# Altium PCB CM5_RP2040_MZM.PcbDoc (part 5 of 5)
Units mil, origin at the board's own origin, x right, y up, seen from the top; angles counter-clockwise.
Board outline 4724.41 x 3543.31 mil, 4 copper layers (Top Layer, GND L2, GND L3, Bottom Layer), stack 62.992 mil thick; 227 components, 122 nets, 905 pads, 3083 vias.
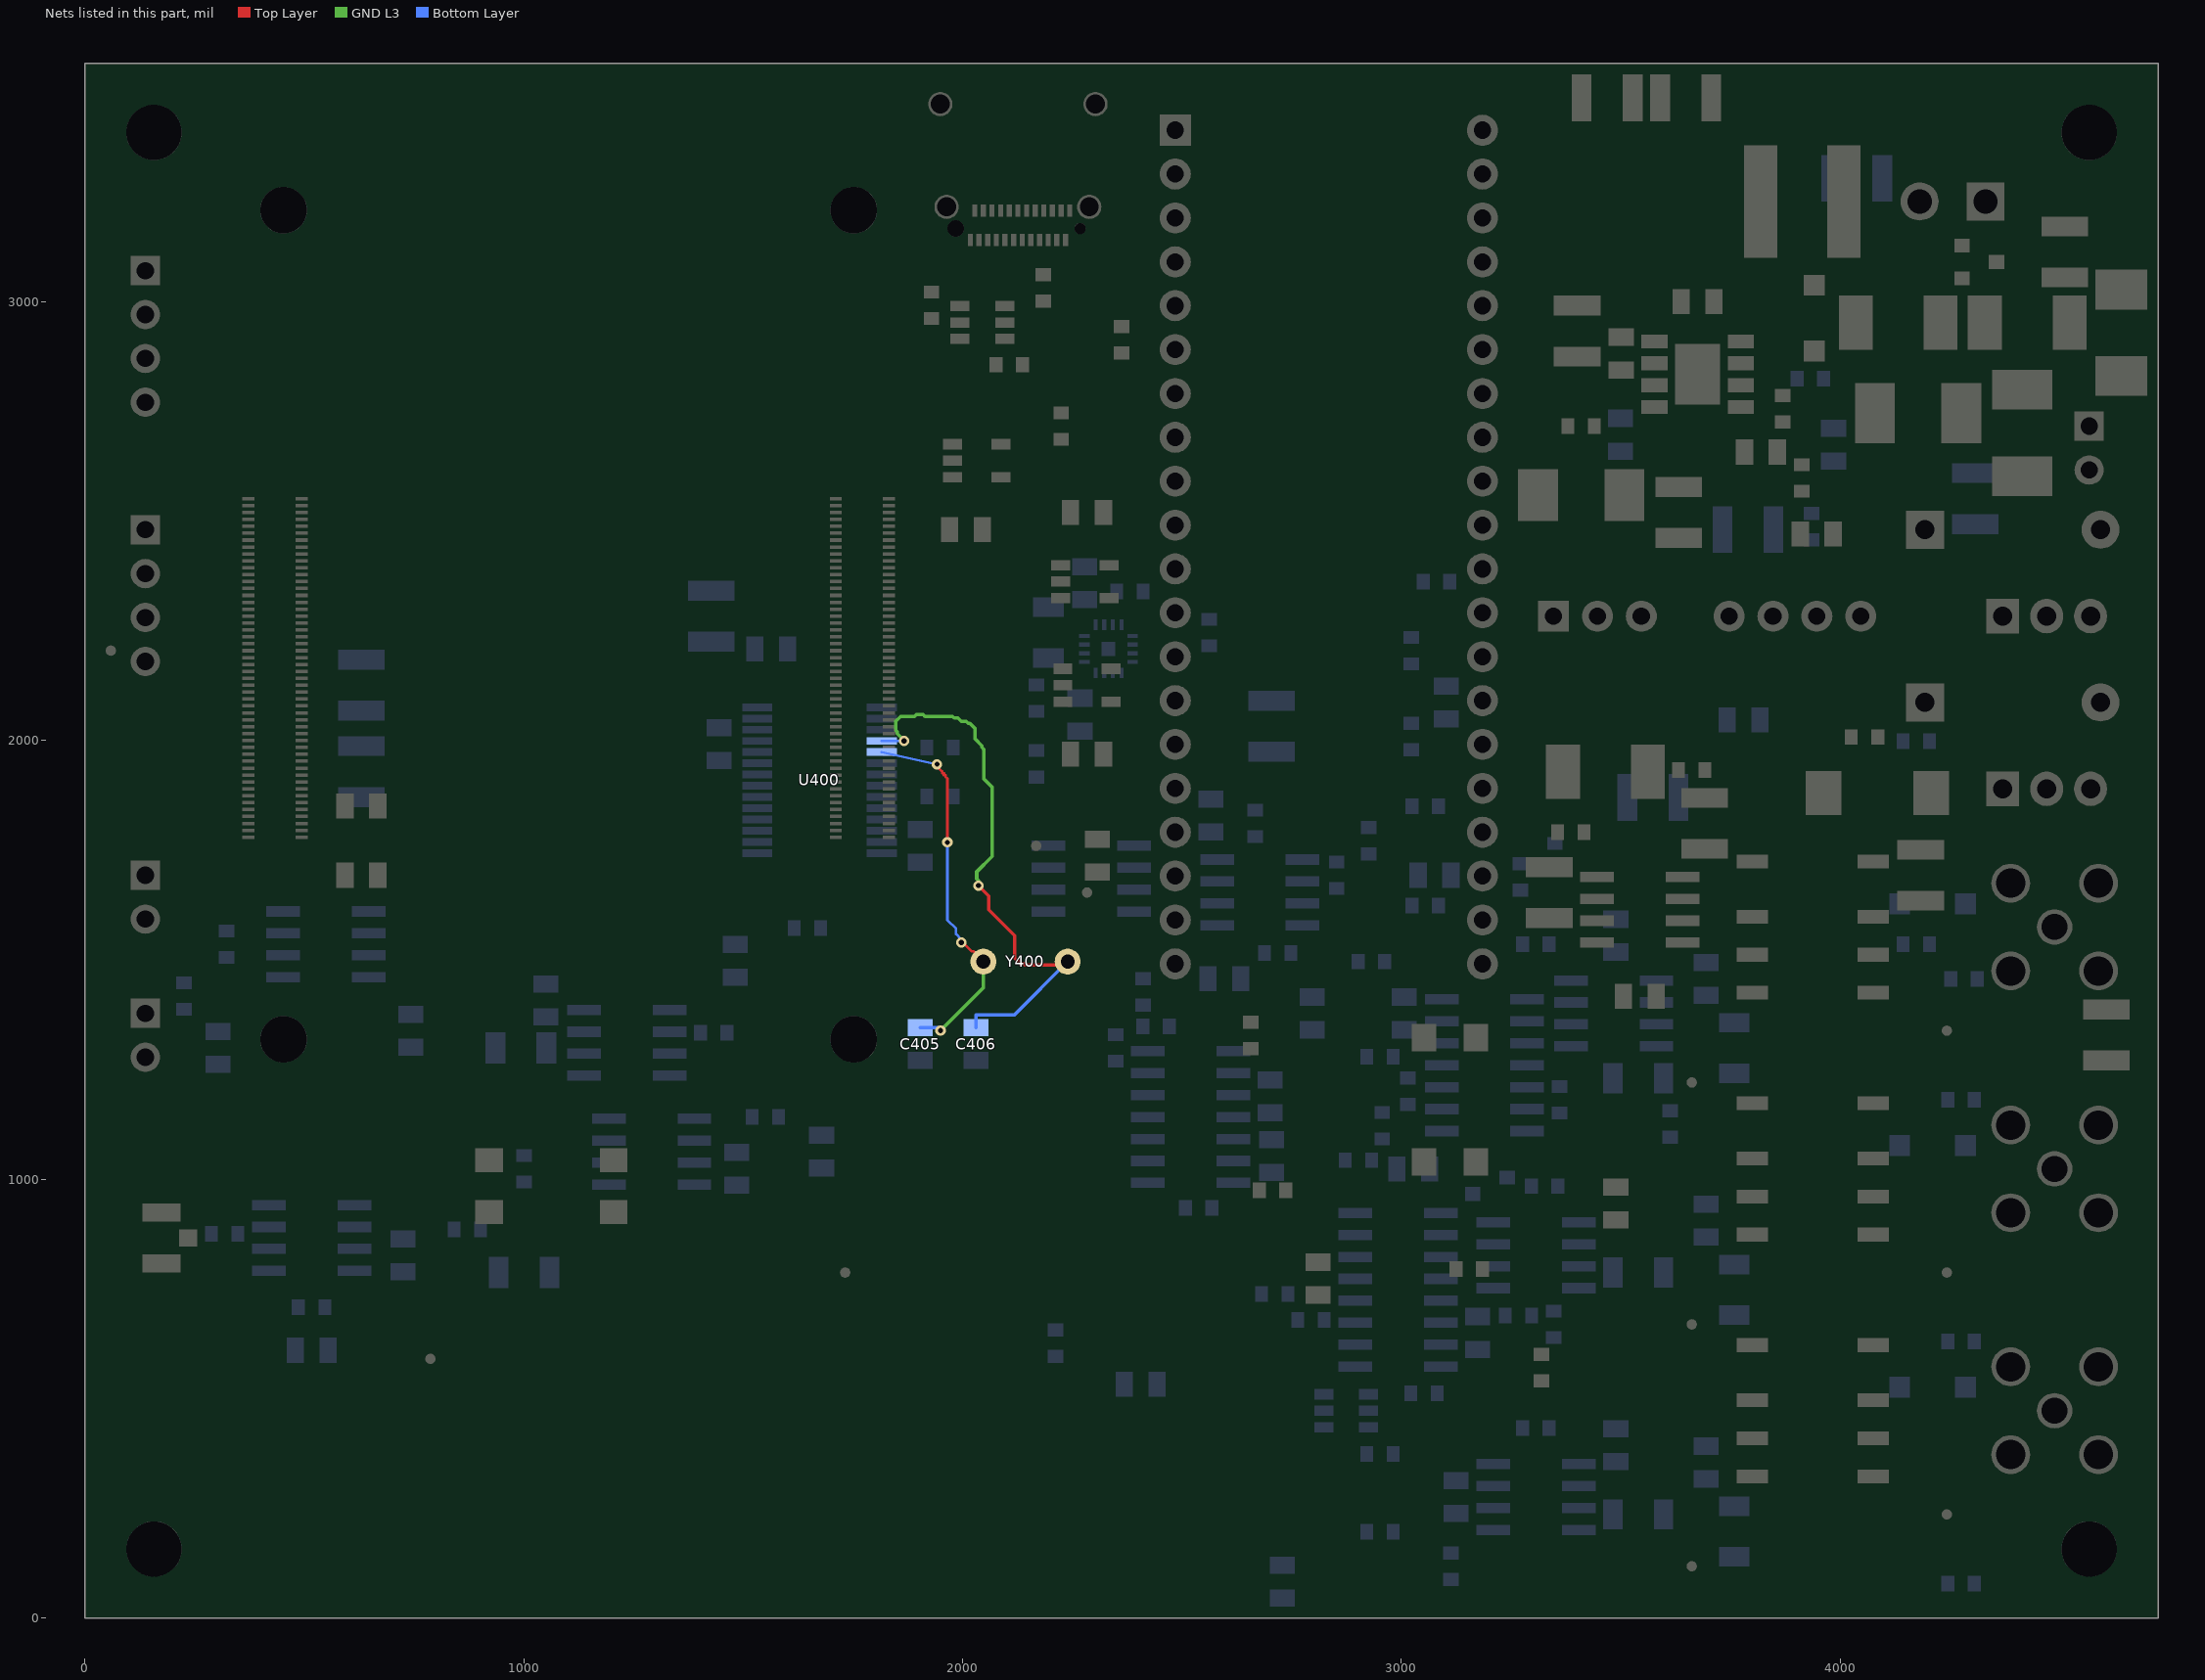
[diagram p7: the nets of this part, all layers, seen from the top]

## Via types
v1: diameter 23.62, hole 11.81, Top Layer to Bottom Layer, tented both sides, 3043 vias
v2: diameter 39.37, hole 19.68, Top Layer to Bottom Layer, tented both sides, 22 vias
v3: diameter 19.68, hole 11.81, Top Layer to Bottom Layer, tented both sides, 14 vias
v4: diameter 21.65, hole 11.81, Top Layer to Bottom Layer, tented both sides, 4 vias

## Nets (pads, with @x,y where several pads share a name; then routed paths per layer and width w, separated by ;. In a path a pad name is that pad's centre, name@x,y a point inside that pad or via, vN(x,y) a via of type N, cw(c..) or ccw(c..) an arc to the next point about the centre after c; other vN are vias at no path point) (continued)
XTAL1: C405.1 U400.19 Y400.1 | length 878.4
  Top Layer w5.91: v1@1941.61,1944.88 1941.61,1940.94 1953.43,1929.13 1953.43,1925.2 1957.36,1925.2 1957.36,1921.26 1961.3,1921.26 1961.3,1917.32 1965.24,1913.39 v1(1965.24,1767.72) ; v1(1996.73,1539.37) 2000.67,1539.37 2020.35,1519.68 2024.29,1519.68 2047.91,1496.06 Y400.1@2047.24,1496.06
  GND L3 w7.87: v1(1949.72,1338.93) 2047.24,1436.45 Y400.1@2047.24,1496.06
  Bottom Layer w5.91: U400.19@1815.63,1973.43 v1(1941.61,1945.87) ; v1(1965.24,1767.72) 1965.24,1590.55 1984.92,1570.87 1984.92,1559.06 1996.73,1547.24 v1(1996.73,1539.37)
  Bottom Layer w7.87: C405.1@1903.27,1345.47 1941.72,1345.47 1943.17,1345.47 v1(1949.72,1338.93)
XTAL2: C406.1 U400.18 Y400.2 | length 1316.5
  Top Layer w7.87: v1(2036.1,1669.29) 2059.72,1645.67 2059.72,1614.17 2118.78,1555.12 2118.78,1503.94 2130.59,1492.13 2138.46,1492.13 2142.4,1488.19 2232.95,1488.19 Y400.2@2240.83,1496.06
  GND L3 w7.87: v1(1866.81,1999.02) 1866.81,2000 1851.06,2015.75 1851.06,2019.68 1847.13,2023.62 1847.13,2043.31 1858.94,2055.12 1890.43,2055.12 1894.37,2059.06 1910.12,2059.06 1914.06,2055.12 1977.05,2055.12 1980.98,2051.18 1988.86,2051.18 1996.73,2043.31 2008.54,2043.31 2012.48,2039.37 2016.42,2039.37 2028.23,2027.56 2028.23,2003.94 2043.98,1988.19 2043.98,1984.25 2047.91,1980.31 2047.91,1913.39 2067.6,1893.7 2067.6,1736.22 2032.17,1700.79 2032.17,1685.04 2036.1,1681.1 v1(2036.1,1669.29)
  Bottom Layer w5.91: U400.18@1815.63,1999.02 v1(1866.81,1999.02)
  Bottom Layer w7.87: C406.1@2030.63,1345.47 2030.63,1375.07 2118.37,1375.07 Y400.2@2239.37,1496.06 Y400.2@2240.83,1496.06
pads on no net: H1. H2. H3. H4. H5. H6. H7. H8. J100.3 J100.4 J100.5 J100.6 J100.9 J100.10 J100.11 J100.12 J100.15 J100.17 J100.18 J100.20 J100.25 J100.26 J100.27 J100.28 J100.29 J100.30 J100.31 J100.34 J100.35 J100.36 J100.37 J100.38 J100.39 J100.40 J100.41 J100.44 J100.45 J100.46 J100.47 J100.48 J100.49 J100.57 J100.61 J100.62 J100.63 J100.64 J100.67 J100.68 J100.69 J100.70 J100.72 J100.73 J100.75 J100.76 J100.80 J100.82 J100.88 J100.89 J100.90 J100.91 J100.94 J100.95 J100.96 J100.97 J100.100 J101.1 J101.2 J101.4 J101.6 J101.9 J101.10 J101.11 J101.12 J101.15 J101.16 J101.17 J101.18 J101.21 J101.22 J101.23 J101.24 J101.27 J101.28 J101.29 J101.30 J101.33 J101.34 J101.35 J101.36 J101.39 J101.40 J101.41 J101.42 J101.43 J101.45 J101.46 J101.47 J101.48 J101.49 J101.51 J101.52 J101.53 J101.54 J101.57 J101.58 J101.59 J101.60 J101.63 J101.64 J101.65 J101.66 J101.69 J101.70 J101.71 J101.72 J101.75 J101.76 J101.77 J101.78 J101.81 J101.82 J101.83 J101.84 J101.87 J101.88 J101.89 J101.90 J101.93 J101.94 J101.95 J101.96 J101.99 J101.100 J102. J102.A2 J102.A3 J102.A8 J102.A10 J102.A11 J102.B2 J102.B3 J102.B8 J102.B10 J102.B11 K700.5 K700.6 K700.7 K800.5 K800.6 K800.7 K900.5 K900.6 K900.7 U101.1 U220.3 U220.5 U220.8 U300.11 U300.12 U300.14 U300.15 U300.16 U300.17 U300.19 U300.20 U300.31 U300.32 U300.34 U300.35 U300.37 U300.40 U301.1 U302.1 U400.10 U400.11 U400.12 U400.13 U400.25 U400.26 U400.27 U400.28 U401.1 U401.3 U401.5 U401.7 U401.8 U500.1 U500.5 U500.8 U501.1 U501.5 U501.8 U502.1 U502.5 U502.8 U601.1 U601.5 U601.8 U700.1 U700.5 U700.8 U800.1 U800.5 U800.8 U900.1 U900.5 U900.8 U1000.4 U1000.12 U1100.1 U1100.5 U1100.8

## Other copper
GND L2:
  region net GND: 5 vertices and 5280 holes, not listed, extent 19.68,19.68 4704.72,3523.62
GND L3:
  drawing of 20 lines, arcs and shapes, not listed

## Silkscreen, mask and mechanical layers (free items; w line width, h text height)
Top Overlay:
  drawing of 22 lines, arcs and shapes, not listed
  text "+15V" at 4451.21,3468.96 h35.43
  text "BUCK 5V" at 3370.95,3220.58 h35.43
  text "FAN" at 200.34,2665.8 h35.43
  text "RELES" at 4165.76,2555.22 h30.71
  text "I2C" at 200.34,2509.93 h35.43
  text "-15V" at 3752.83,1811.12 h30.71
  text "CM5" at 299.44,1706.68 h35.43 r90
  text "BOOT" at 64,1606.31 h35.43 r90
  text "BIAS I" at 4321.33,1600.15 h35.43 r90
  text "PICO" at 2883.25,1327.64 h35.43
  text "PMIC" at 64,1221.27 h35.43 r90
  text "PWR CM5" at 1255.77,1019.34 h35.43
  text "RUN" at 3137.53,949.26 h35.43
  text "BIAS Q" at 4276.97,904.65 h30.71 r89.77
  text "FOTODIODO" at 251.52,728.82 h35.43
  text "BIAS PHI" at 4263.68,300.78 h35.43 r88.31
  text "CM5 / RP2040 / MZM" at 708.66,157.48 h39.37
Bottom Overlay:
  text "DAC" at 2412.46,1964.98 h35.43
  text "JANELA" at 2930.28,1933.18 h27.56
  text "ADC" at 1481.98,1800.67 h35.43
  text "DRV I" at 3688.97,1538.25 h35.43
  text "REF DAC" at 1950.39,1463.84 h35.43 r270
  text "REF ADC" at 1125.88,1424.39 h30.71 r270
  text "TIA" at 697.36,985.52 h35.43
  text "DRV Q" at 3607.39,932.4 h30.71
  text "WDT" at 2797.68,838.37 h35.43 r270
  text "FILTRO" at 1153.61,767.67 h35.43 r270
  text "DRV PHI" at 3415.74,58.7 h35.43
Board Outline:
  the board outline again, w5.91
  text "ROTEADA - REVISAO DE ENGENHARIA" at 708.66,78.74 h31.5